# Altium PCB CM5_R6_Serigrafia_VIRTUS.PcbDoc (part 2 of 3)
Units mil, origin at the board's own origin, x right, y up, seen from the top; angles counter-clockwise.
Board outline 7086.61 x 4724.41 mil, 4 copper layers (Top Layer, GND L2, GND L3, Bottom Layer), stack 62.992 mil thick; 227 components, 122 nets, 905 pads, 209 vias.
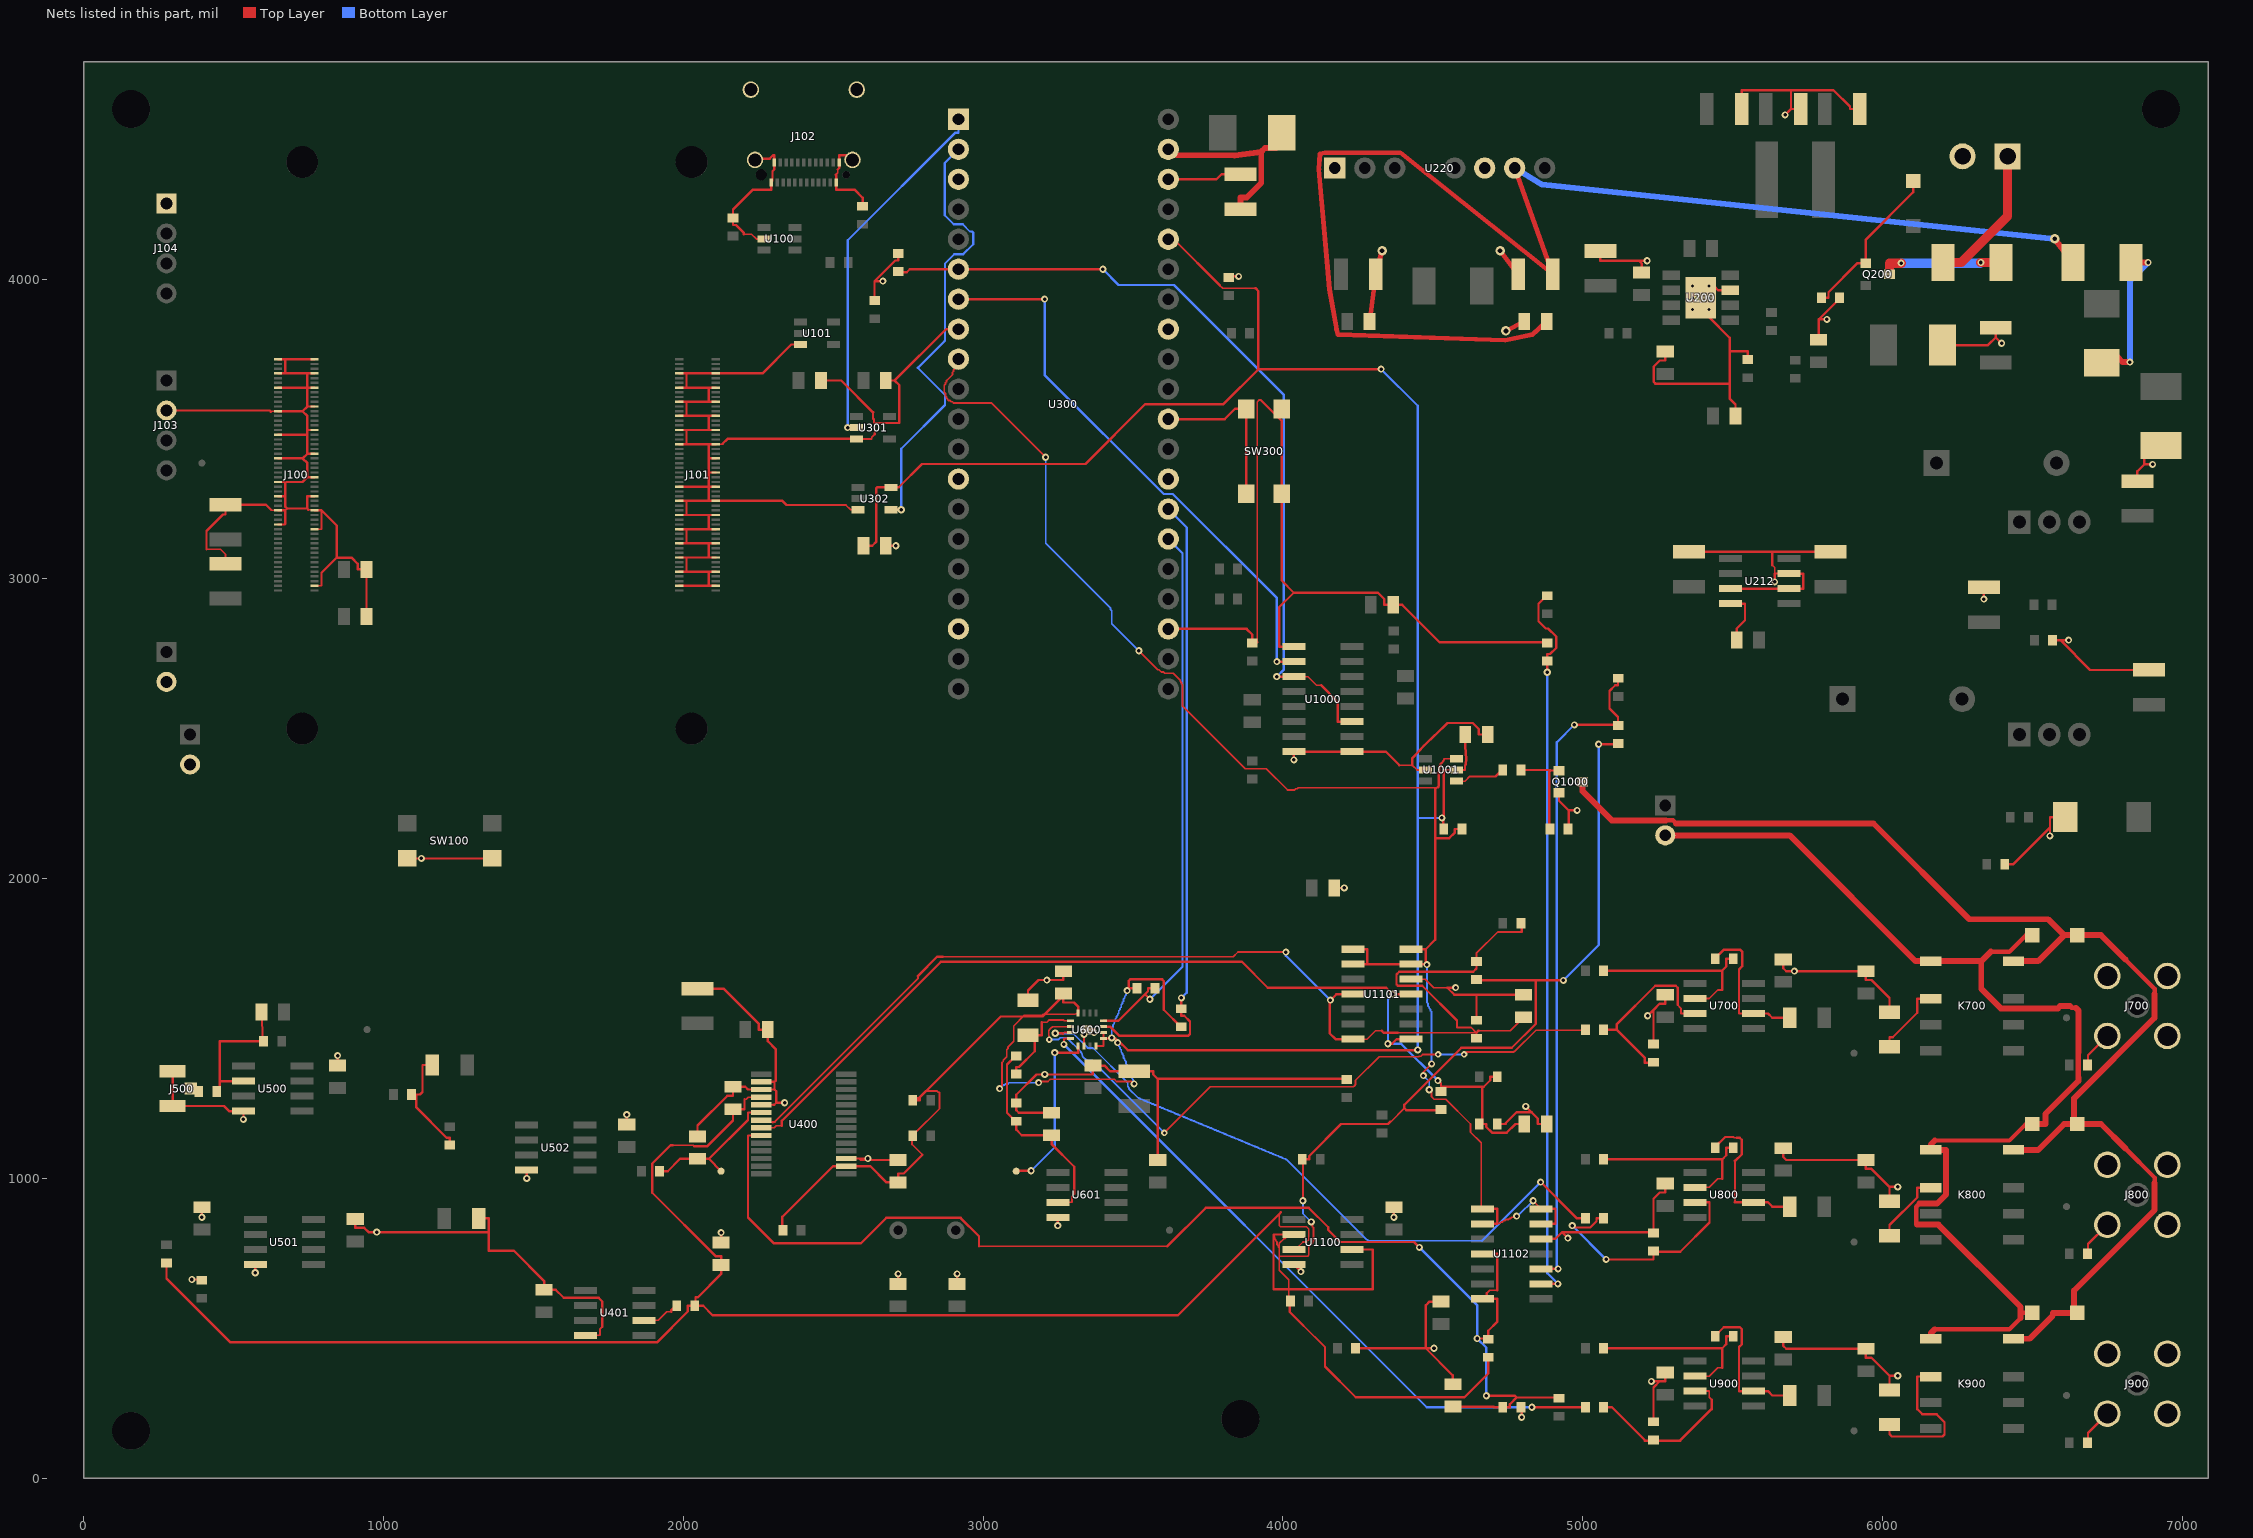
[diagram p4: the nets of this part, all layers, seen from the top]

## Via types
v1: diameter 23.62, hole 11.81, Top Layer to Bottom Layer, tented both sides, 181 vias
v2: diameter 21.65, hole 9.84, Top Layer to Bottom Layer, tented both sides, 24 vias
v3: diameter 31.5, hole 15.75, Top Layer to Bottom Layer, tented both sides, 4 vias

## Nets (pads, with @x,y where several pads share a name; then routed paths per layer and width w, separated by ;. In a path a pad name is that pad's centre, name@x,y a point inside that pad or via, vN(x,y) a via of type N, cw(c..) or ccw(c..) an arc to the next point about the centre after c; other vN are vias at no path point) (continued)
COIL_5V: D700.1 D800.1 D900.1 K700.1 K800.1 K900.1 SW1000.2 | length 4011.5
  Top Layer w14.76: 6115.55,845.4 6112.64,848.33 6112.64,905.03 6122.99,915.39 ; 6174.57,496.06 6423.66,496.06 6460.94,533.35 ; 6174.57,1126 6423.66,1126 6478.78,1181.1 D800.1@6509.84,1181.1 ; 6361.34,1755.92 6423.66,1755.92 6478.78,1811.02 D700.1@6509.84,1811.02 ; 6460.94,551.18 6478.78,551.18 D900.1@6509.84,551.18 ; 6625.55,1574.19 6630.87,1568.89 6645,1568.89
  Top Layer w17.72: 6653.54,1336.61 6653.54,1419.29
  Top Layer w19.68: SW1000.2@5275.59,2144.09 5690.47,2144.09 6110.16,1724.41 K700.1@6161.42,1724.41 6329.84,1724.41 ; 6115.55,845.39 6186.54,845.39 6460.94,570.98 6460.94,551.18 6460.94,533.35 ; 6122.99,915.39 6182.36,915.39 6212.68,945.72 6212.68,1094.49 K800.1@6161.42,1094.49 6161.42,1112.87 6174.57,1126 ; K900.1@6161.42,464.57 6161.42,482.95 6174.57,496.06 ; 6361.34,1755.92 6329.84,1724.41 ; D800.1@6509.84,1181.1 6543.39,1181.1 6543.39,1214.64 6653.54,1324.8 6653.54,1336.61 ; 6625.55,1574.19 6592.44,1574.19 6585.08,1566.85 6394.8,1566.85 6329.84,1631.83 6329.84,1724.41 ; 6645,1568.89 6653.54,1560.35 6653.54,1419.29
COIL_RETURN: D700.2 D800.2 D900.2 K700.8 K800.8 K900.8 Q1000.3 | length 4367.1
  Top Layer w14.76: 5277.09,2194.09 5301.34,2194.09 5312.01,2183.43 ; 6810.43,1099.9 6907.91,1002.44 6907.91,984.58 ; 6810.43,1729.82 6907.91,1632.36 6907.91,1614.5
  Top Layer w19.68: Q1000.3@5000,2322.83 5000,2291.26 5097.17,2194.09 5277.09,2194.09 ; 5312.01,2183.43 5970.04,2183.43 6289.21,1864.27 6552.99,1864.27 6606.22,1811.02 ; K900.8@6437.01,464.57 6491.22,464.57 6568.39,541.73 6568.39,551.18 6606.22,551.18 6639.76,551.18 6639.76,625.67 6907.91,893.8 6907.91,984.58 ; K800.8@6437.01,1094.49 6519.61,1094.49 6606.22,1181.1 D800.2@6639.76,1181.1 ; K700.8@6437.01,1724.41 6519.61,1724.41 6606.22,1811.02 ; 6810.43,1099.9 6729.25,1181.1 D800.2@6639.76,1181.1 ; 6810.43,1729.82 6729.25,1811.02 6639.76,1811.02 6606.22,1811.02 ; 6907.91,1614.5 6907.91,1535.1 6639.76,1266.95 D800.2@6639.76,1181.1
DAC_CS_N: R600.2 U300.26 U600.12 | length 1848.5
  Top Layer w7.87: U600.12@3401.57,1525.59 3451.48,1525.59 3539.76,1613.87 ; v1(3556.46,1597.17) 3539.76,1613.87 ; R600.2@3575.79,1633.86 3550.12,1633.86 3550.12,1624.23 3539.76,1613.87
  Bottom Layer w7.87: v1(3556.46,1597.17) 3665.12,1705.83 3665.12,3085.28 U300.26@3617.72,3132.68
DAC_I: R702.1 U600.2 | length 2187.6
  Top Layer w5.91: v2(3220.47,1462.6) 3220.47,1474.41 3218.5,1476.38 3218.5,1492.13 3220.47,1494.09 3220.47,1496.06 3228.35,1503.94 3230.31,1503.94 3232.28,1505.91 U600.2@3291.34,1505.91 ; v2(3604.33,1151.57) 3757.87,1305.12 4234.25,1305.12 4236.22,1307.09 4238.19,1307.09 4240.16,1309.06 4240.16,1311.02 4242.13,1312.99 4242.13,1326.77 4320.87,1405.51 4452.76,1405.51 4454.72,1407.48 4460.63,1407.48 4466.54,1413.39 v2(4517.72,1413.39) ; v2(4604.33,1413.39) 4612.2,1421.26 4769.69,1421.26 4771.65,1423.23 4773.62,1423.23 4844.49,1494.09 5003.94,1494.09 R702.1@5006.89,1496.06
  Bottom Layer w5.91: v2(3220.47,1462.6) 3250,1462.6 3251.97,1464.57 3253.94,1464.57 3257.87,1468.5 3279.53,1468.5 3326.77,1421.26 3326.77,1419.29 3328.74,1417.32 3328.74,1415.35 3330.71,1413.39 3330.71,1409.45 3332.68,1407.48 3332.68,1405.51 3340.55,1397.64 3342.52,1397.64 3344.49,1395.67 3346.46,1395.67 3348.43,1393.7 3362.2,1393.7 v2(3604.33,1151.57) ; v2(4517.72,1413.39) v2(4604.33,1413.39)
DAC_LDAC_N: R601.2 U300.27 U600.11 | length 2104.7
  Top Layer w7.87: U600.11@3401.57,1505.91 3423.3,1505.91 3453.27,1475.94 3684.6,1475.94 3690.04,1481.38 3690.04,1523.26 3671.04,1542.25 3661.42,1542.25 v1(3661.42,1601.54)
  Bottom Layer w7.87: U300.27@3617.72,3232.68 3679.15,3171.24 3679.15,1619.28 v1(3661.42,1601.54)
DAC_PHI: R902.1 U600.4 | length 2280.3
  Top Layer w7.87: v1(3269.61,1446.52) 3269.61,1466.54 U600.4@3291.34,1466.54 ; v1(4830.63,236.22) R902.1@5006.89,236.22
  Bottom Layer w7.87: v1(3269.61,1446.52) 4479.92,236.22 v1(4830.63,236.22)
DAC_Q: R802.1 U600.3 | length 2248.8
  Top Layer w5.91: 3265.94,1481.57 3270.59,1486.22 U600.3@3291.34,1486.22
  Top Layer w7.87: v1(3240.52,1483.86) 3263.64,1483.86 3265.94,1481.57 ; v1(4860,987.37) 4981.22,866.14 R802.1@5006.89,866.14
  Bottom Layer w5.91: 3302.25,1483.86 3303.15,1480.31 3348.43,1435.04 3364.17,1435.04 3366.14,1433.07 3368.11,1433.07 3482.28,1318.9 3482.28,1307.09 3484.25,1305.12 3484.25,1303.15 3486.22,1301.18 3486.22,1299.21 3517.72,1267.72 3519.68,1267.72 3521.65,1265.75 3523.62,1265.75 3525.59,1263.78 3529.53,1263.78 3531.5,1261.81 3533.46,1261.81 3535.43,1259.84 3537.4,1259.84 3539.37,1257.87 3543.31,1257.87 3545.28,1255.91 3547.24,1255.91 3549.21,1253.94 3553.15,1253.94 3555.12,1251.97 3557.09,1251.97 3559.06,1250 3561.02,1250 3562.99,1248.03 3566.93,1248.03 3568.9,1246.06 3570.87,1246.06 3572.83,1244.09 3576.77,1244.09 3578.74,1242.13 3580.71,1242.13 3582.68,1240.16 3584.65,1240.16 3586.61,1238.19 3590.55,1238.19 3592.52,1236.22 3594.49,1236.22 3596.46,1234.25 3600.39,1234.25 3602.36,1232.28 3604.33,1232.28 3606.3,1230.31 3608.27,1230.31 3610.24,1228.35 3614.17,1228.35 3616.14,1226.38 3618.11,1226.38 3620.08,1224.41 3624.02,1224.41 3625.98,1222.44 3627.95,1222.44 3629.92,1220.47 3633.86,1220.47 3635.83,1218.5 3637.8,1218.5 3639.76,1216.54 3641.73,1216.54 3643.7,1214.57 3647.64,1214.57 3649.61,1212.6 3651.57,1212.6 3653.54,1210.63 3657.48,1210.63 3659.45,1208.66 3661.42,1208.66 3663.39,1206.69 3665.35,1206.69 3667.32,1204.72 3671.26,1204.72 3673.23,1202.76 3675.2,1202.76 3677.17,1200.79 3681.1,1200.79 3683.07,1198.82 3685.04,1198.82 3687.01,1196.85 3688.98,1196.85 3690.94,1194.88 3694.88,1194.88 3696.85,1192.91 3698.82,1192.91 3700.79,1190.94 3704.72,1190.94 3706.69,1188.98 3708.66,1188.98 3710.63,1187.01 3712.6,1187.01 3714.57,1185.04 3718.5,1185.04 3720.47,1183.07 3722.44,1183.07 3724.41,1181.1 3728.35,1181.1 3730.31,1179.13 3732.28,1179.13 3734.25,1177.17 3736.22,1177.17 3738.19,1175.2 3742.13,1175.2 3744.09,1173.23 3746.06,1173.23 3748.03,1171.26 3751.97,1171.26 3753.94,1169.29 3755.91,1169.29 3757.87,1167.32 3761.81,1167.32 3763.78,1165.35 3765.75,1165.35 3767.72,1163.39 3769.68,1163.39 3771.65,1161.42 3775.59,1161.42 3777.56,1159.45 3779.53,1159.45 3781.5,1157.48 3785.43,1157.48 3787.4,1155.51 3789.37,1155.51 3791.34,1153.54 3793.31,1153.54 3795.28,1151.57 3799.21,1151.57 3801.18,1149.61 3803.15,1149.61 3805.12,1147.64 3809.06,1147.64 3811.02,1145.67 3812.99,1145.67 3814.96,1143.7 3816.93,1143.7 3818.9,1141.73 3822.83,1141.73 3824.8,1139.76 3826.77,1139.76 3828.74,1137.8 3832.68,1137.8 3834.65,1135.83 3836.61,1135.83 3838.58,1133.86 3840.55,1133.86 3842.52,1131.89 3846.46,1131.89 3848.43,1129.92 3850.39,1129.92 3852.36,1127.95 3856.3,1127.95 3858.27,1125.98 3860.24,1125.98 3862.2,1124.02 3866.14,1124.02 3868.11,1122.05 3870.08,1122.05 3872.05,1120.08 3874.02,1120.08 3875.98,1118.11 3879.92,1118.11 3881.89,1116.14 3883.86,1116.14 3885.83,1114.17 3889.76,1114.17 3891.73,1112.2 3893.7,1112.2 3895.67,1110.24 3897.64,1110.24 3899.61,1108.27 3903.54,1108.27 3905.51,1106.3 3907.48,1106.3 3909.45,1104.33 3913.39,1104.33 3915.35,1102.36 3917.32,1102.36 3919.29,1100.39 3921.26,1100.39 3923.23,1098.43 3927.17,1098.43 3929.13,1096.46 3931.1,1096.46 3933.07,1094.49 3937.01,1094.49 3938.98,1092.52 3940.94,1092.52 3942.91,1090.55 3944.88,1090.55 3946.85,1088.58 3950.79,1088.58 3952.76,1086.61 3954.72,1086.61 3956.69,1084.65 3960.63,1084.65 3962.6,1082.68 3964.57,1082.68 3966.54,1080.71 3968.5,1080.71 3970.47,1078.74 3974.41,1078.74 3976.38,1076.77 3978.35,1076.77 3980.31,1074.8 3984.25,1074.8 3986.22,1072.83 3988.19,1072.83 3990.16,1070.87 3994.09,1070.87 3996.06,1068.9 3998.03,1068.9 4000,1066.93 4001.97,1066.93 4003.94,1064.96 4007.87,1064.96 4009.84,1062.99 4011.81,1062.99 4279.53,795.28 4281.5,795.28 4283.46,793.31 4285.43,793.31 4287.4,791.34 4659.45,791.34 4664.21,791.61
  Bottom Layer w7.87: v1(3240.52,1483.86) 3302.25,1483.86 ; 4664.21,791.61 v1(4860,987.37)
DAC_SPARE: TP600.1 U600.5 | length 577.1
  Top Layer w7.87: TP600.1@3110.24,1023.62 3111.78,1025.16 v1(3160.31,1025.16) ; v1(3238.83,1419.22) 3316.93,1419.22 U600.5@3316.93,1440.94
  Bottom Layer w7.87: v1(3160.31,1025.16) 3238.83,1103.68 v1(3238.83,1419.22)
DRV_I: R701.1 R704.1 U700.6 | length 492.2
  Top Layer w7.87: R701.1@5439.96,1732.28 5469.65,1761.95 5526.14,1761.95 5531.93,1756.16 5531.93,1707.11 5521.57,1696.76 5521.57,1549.8 U700.6@5569.88,1549.8 5618.19,1549.8 5632.56,1535.43 R704.1@5690.45,1535.43
DRV_PHI: R901.1 R904.1 U900.6 | length 549.2
  Top Layer w7.87: R901.1@5439.96,472.44 5470.47,502.95 5524.57,502.95 5530.59,496.93 5530.59,445.94 5521.57,436.93 5521.57,289.96 U900.6@5569.88,289.96 5618.19,289.96 5632.56,275.59 ; 5632.56,275.59 R904.1@5690.45,275.59 5632.56,275.59
DRV_Q: R801.1 R804.1 U800.6 | length 575.1
  Top Layer w5.91: 5501.85,1137.82 5504.8,1134.88 5514.53,1134.88 ; 5507.8,919.88 5507.8,1058.94
  Top Layer w7.87: R801.1@5439.96,1102.36 5475.43,1137.82 5501.85,1137.82 ; 5507.8,919.88 U800.6@5569.88,919.88 5618.19,919.88 5632.56,905.51 ; 5507.8,1058.94 5509.96,1058.94 5530.59,1079.56 5530.59,1128.58 5524.29,1134.88 5514.53,1134.88 ; 5632.56,905.51 R804.1@5690.45,905.51 5632.56,905.51
EXT_P15: F200.1 J200.1 | length 478.6
  Top Layer w31.5: F200.1@6202.56,4055.12 6262.87,4055.12 6417.32,4209.57 J200.1@6417.32,4409.45
FAULT_N: R1004.2 U300.9 U1001.6 U1101.1 U1101.2 U1101.13 U1101.14 U1102.1 U1102.2 U1102.13 U1102.14 | length 5398.4
  Top Layer w5.91: U300.9@2917.72,3732.68 2913.39,3724.41 2913.39,3720.47 2909.45,3716.54 2909.45,3708.66 2905.51,3704.72 2905.51,3700.79 2901.57,3696.85 2901.57,3692.91 2897.64,3688.98 2897.64,3681.1 2877.95,3661.42 2877.95,3657.48 2874.02,3653.54 2874.02,3649.61 2870.08,3645.67 2870.08,3622.05 2874.02,3618.11 2874.02,3610.24 2877.95,3606.3 2877.95,3602.36 2885.83,3594.49 2889.76,3594.49 2893.7,3590.55 2897.64,3590.55 2901.57,3586.61 3027.56,3586.61 v1(3208.66,3405.51) ; v1(3519.68,2759.84) 3582.68,2696.85 3586.61,2696.85 3594.49,2688.98 3602.36,2688.98 3606.3,2685.04 3633.86,2685.04 3657.48,2661.42 3657.48,2657.48 3661.42,2653.54 3661.42,2649.61 3665.35,2645.67 3665.35,2574.8 3874.02,2366.14 3944.88,2366.14 4015.75,2295.28 4039.37,2295.28 4043.31,2299.21 4047.24,2299.21 4051.18,2303.15 4519.69,2303.15 4519.69,2374.02 4531.5,2385.83 4537.32,2395.58 ; U1101.13@4428.15,1714.17 4437.01,1712.6 v1(4480.31,1712.6) ; v1(4468.5,1342.52) 4468.5,1354.33 v1(4496.06,1381.89) ; v1(4488.19,1295.28) 4496.06,1287.4 4496.06,1271.65 4503.94,1263.78 4543.31,1263.78 4625.98,1181.1 4625.98,1153.54 4661.42,1118.11 4661.42,905.51 U1102.1@4666.34,898.03 ; 4519.69,2355.3 4522.64,2358.26 4522.64,2369.1 ; 4525.63,2383.87 4537.32,2395.58 ; U1001.6@4572.36,2399.61 4537.32,2399.61 4537.32,2395.58 ; 4714.65,848.03 4724.41,850.39 4728.35,854.33 4732.28,854.33 4736.22,858.27 4740.16,858.27 4744.09,862.2 4751.97,862.2 4755.91,866.14 4759.84,866.14 4763.78,870.08 4771.65,870.08 4775.59,874.02 v1(4779.53,874.02) ; v1(4834.65,925.2) 4854.33,905.51 U1102.14@4861.22,898.03
  Top Layer w7.87: U1101.2@4233.27,1714.17 4281.57,1714.17 ; U1101.1@4233.27,1764.17 4281.57,1764.17 4281.57,1714.17 ; U1101.14@4428.15,1764.17 4476.46,1764.17 ; 4519.69,2355.3 4519.69,2309.73 4507.87,2297.93 4507.87,2134.49 ; 4522.64,2369.1 4525.63,2372.06 4525.63,2383.87 ; R1004.2@4599.41,2165.35 4573.74,2165.35 4573.74,2153.78 4554.45,2134.49 4507.87,2134.49 ; U1102.2@4666.34,848.03 4714.65,848.03 4714.65,898.03 U1102.1@4666.34,898.03 ; U1102.13@4861.22,848.03 4909.53,848.03 4909.53,898.03 U1102.14@4861.22,898.03 ; 4281.57,1714.17 U1101.13@4428.15,1714.17 4476.46,1714.17 4476.46,1764.17 ; 4476.46,1764.17 4507.87,1795.61 4507.87,2134.49
  Bottom Layer w5.91: v1(3208.66,3405.51) 3208.66,3118.11 3425.2,2901.57 3425.2,2897.64 3429.13,2893.7 3429.13,2850.39 v1(3519.68,2759.84) ; v1(4468.5,1342.52) 4488.19,1322.83 v1(4488.19,1295.28) ; v1(4480.31,1712.6) 4480.31,1586.61 4484.25,1582.68 4484.25,1574.8 4488.19,1570.87 4488.19,1566.93 4492.13,1562.99 4492.13,1559.06 4496.06,1555.12 v1(4496.06,1381.89) ; v1(4779.53,874.02) 4783.46,877.95 4787.4,877.95 v1(4834.65,925.2)
GATE_REV: D200.2 Q200.1 R200.1 | length 538.8
  Top Layer w7.87: R200.1@5794.29,3937.01 5819.96,3937.01 5819.96,3955.86 5917.24,4053.15 Q200.1@5944.88,4053.15 5944.88,4131.81 6102.36,4289.3 D200.2@6102.36,4316.93
GND: C100.2 C110.2 C111.2 C112.2 C113.2 C200.2 C201.2 C202.2 C203.2 C205.2 C206.2 C207.2 C208.2 C209.2 C210.2 C211.2 C212.2 C213.1 C214.2 C215.2 C220.2 C221.2 C222.1 C223.1 C300.2 C301.2 C302.2 C400.2 C401.2 C402.2 C403.2 C404.2 C405.2 C406.2 C407.2 C501.2 C502.2 C503.2 C505.2 C506.2 C507.2 C600.2 C601.2 C602.2 C603.2 C604.2 C605.2 C700.2 C701.2 C702.2 C800.2 C801.2 C802.2 C900.2 C901.2 C902.2 C1002.2 C1003.2 C1004.2 C1005.2 C1100.2 C1110.2 C1111.2 C1112.2 D201.2 D203.1 J100.1 J100.2 J100.7 J100.8 J100.13 J100.14 J100.22 J100.23 J100.32 J100.33 J100.42 J100.43 J100.52 J100.53 J100.59 J100.60 J100.65 J100.66 J100.71 J100.74 J100.98 J101.7 J101.8 J101.13 J101.14 J101.19 J101.20 J101.25 J101.26 J101.31 J101.32 J101.37 J101.38 J101.44 J101.50 J101.55 J101.56 J101.61 J101.62 J101.67 J101.68 J101.73 J101.74 J101.79 J101.80 J101.85 J101.86 J101.91 J101.92 J101.97 J101.98 J102.A1 J102.A12 J102.B1 J102.B12 J102.SH J103.2 J104.1 J200.2 J500.2 J700.2 J800.2 J900.2 JP100.2 JP101.2 Q1000.2 R100.2 R101.2 R103.2 R200.2 R203.2 R211.2 R213.2 R302.2 R502.2 R603.2 R703.2 R705.2 R706.2 R803.2 R805.2 R806.2 R903.2 R905.2 R906.2 R1003.2 R1005.2 R1007.2 R1010.2 R1102.2 R1104.2 R1112.2 R1116.2 R1120.2 SW100.2 SW300.2 U100.2 U101.3 U200.7 U200.9 U212.3 U212.6 U212.7 U220.1 U220.6 U300.3 U300.8 U300.13 U300.18 U300.23 U300.28 U300.33 U300.38 U301.3 U302.3 U400.2 U400.3 U400.5 U400.17 U401.4 U500.4 U501.4 U502.4 U600.6 U600.17 U601.4 U1000.1 U1000.8 U1000.9 U1001.2 U1100.4 U1101.12 U1102.12 | length 27829.3
  Top Layer w5.91: 409.19,3098.41 455.8,3098.41 472.44,3081.77 C111.2@472.44,3050.2 ; 623.42,3557.16 625.32,3559.06 J100.23@648.03,3559.05 ; 624.33,3230.3 625.32,3229.31 625.32,3228.35 J100.65@648.03,3228.35 ; J100.71@648.03,3181.1 670.74,3181.1 670.74,3182.06 671.74,3183.06 ; 749.13,3230.3 767.34,3230.3 J100.66@769.29,3228.35 ; J100.98@769.29,2976.38 792,2976.38 792,2977.34 793,2978.33 ; J100.74@769.29,3165.35 792,3165.35 792,3165.83 ; 792.93,3165.83 792.93,3228.35 ; U401.4@1674.21,476.18 1721.53,476.18 1721.53,496.69 1729.36,504.53 ; J101.38@2107.87,3448.82 2130.59,3448.82 2130.59,3449.78 2131.58,3450.77 ; 2200.81,4149.59 2227.3,4149.59 2243.04,4133.86 U100.2@2278.05,4133.86 ; U400.5@2259.84,1245.08 2300.24,1245.08 ; J102.A12@2293.31,4322.05 2297.23,4325.97 2297.23,4342.8 ; 2303.22,1245.08 2310.1,1251.95 ; 2344.04,3246.05 2542.26,3246.05 2558,3230.31 U302.3@2593.01,3230.31 ; 2507.81,4347.78 2514.75,4354.72 2514.75,4365.34 ; U301.3@2593.01,3466.54 2628.03,3466.54 2628.03,3471.52 2638.78,3482.27 ; 2632.89,3534.44 2632.89,3555.03 ; 2635.85,3519.67 2638.78,3519.67 ; 2638.78,3486.22 2638.78,3519.67 ; 2720.26,3519.67 2638.78,3519.67 ; R1005.2@3914.37,2788.39 3914.37,3589.81 3921.14,3596.58 ; 4388.66,2377.94 4432.05,2377.94 4447.76,2362.2 U1001.2@4482.76,2362.2 ; U1101.12@4428.15,1664.17 4475.47,1664.17 4503.78,1635.84 4548.35,1635.84 ; 5632.83,3045.46 5640.67,3037.63 5640.67,3017.13 U212.7@5687.99,3017.13
  Top Layer w7.87: J103.2@275.59,3561.42 619.16,3561.42 623.42,3557.16 ; J500.2@296.26,1357.28 J500.2@296.26,1241.14 467.25,1241.14 484.18,1224.21 U500.4@532.48,1224.21 v1(532.48,1196.65) ; v1(360.24,662.4) R502.2@393.7,662.4 ; v1(393.7,870.08) C502.2@393.7,903.54 ; 409.19,3098.41 409.19,3159.38 464.3,3214.49 472.44,3214.49 C110.2@472.44,3247.05 607.58,3247.05 624.33,3230.3 ; v1(571.85,684.84) U501.4@571.85,712.4 ; J100.65@648.03,3228.35 671.73,3228.35 ; J100.59@648.03,3275.59 671.73,3275.59 ; J100.53@648.03,3322.83 671.73,3322.83 ; J100.43@648.03,3401.57 729.85,3401.57 ; J100.33@648.03,3480.31 745.59,3480.31 ; J100.23@648.03,3559.05 729.85,3559.06 ; J100.13@648.03,3637.8 745.59,3637.8 ; J100.7@648.03,3685.04 659.88,3685.04 671.73,3685.04 ; J100.1@648.03,3732.28 671.73,3732.28 ; 671.73,3183.06 671.73,3228.35 ; 749.13,3230.3 744.91,3234.52 ; J100.66@769.29,3228.35 792.93,3228.35 843.61,3177.67 843.61,3070.68 ; J100.60@769.29,3275.59 745.59,3275.59 745.59,3235.2 744.91,3234.52 ; J100.52@769.29,3338.58 745.59,3338.58 ; J100.42@769.29,3417.32 745.59,3417.32 ; J100.32@769.29,3496.06 745.65,3496.06 ; J100.22@769.29,3574.8 745.59,3574.8 ; J100.14@769.29,3637.8 745.59,3637.8 ; J100.8@769.29,3685.04 745.59,3685.04 ; J100.2@769.29,3732.28 745.59,3732.28 671.73,3732.28 ; 792,3165.83 792.93,3165.83 ; 793,2978.33 793,3020.07 843.61,3070.68 ; C501.2@846.46,1375.98 v1(846.46,1409.45) ; C503.2@905.51,864.17 905.51,834.57 935.11,834.57 949.39,820.29 ; C113.2@942.91,2874.02 C112.2@942.91,3031.5 913.31,3031.5 913.31,3050 892.63,3070.68 843.61,3070.68 ; v1(976.95,820.29) 949.39,820.29 ; v1(1125.98,2066.93) SW100.2@1078.74,2066.93 SW100.2@1362.2,2066.93 ; C505.2@1317.91,866.14 1350.47,866.14 1350.47,820.29 ; v1(1477.36,999.8) U502.4@1477.36,1027.36 ; 1729.36,504.53 1729.36,589.09 1717.28,601.18 1600.67,601.18 1573.89,627.95 C407.2@1535.43,627.95 1535.43,657.56 1434.58,758.43 1350.47,758.43 1350.47,820.29 ; C506.2@1811.02,1179.13 v1(1811.02,1212.6) ; J101.97@1986.61,2976.38 2084.18,2976.38 ; J101.91@1986.61,3023.62 2010.31,3023.62 ; J101.85@1986.61,3070.87 2010.31,3070.87 ; J101.79@1986.61,3118.11 2010.31,3118.11 ; J101.73@1986.61,3165.35 2010.31,3165.35 ; J101.67@1986.61,3212.6 2010.31,3212.6 ; J101.61@1986.61,3259.84 2010.31,3259.84 ; J101.55@1986.61,3307.09 2084.18,3307.09 ; J101.37@1986.61,3448.82 2010.31,3448.82 ; J101.31@1986.61,3496.06 2010.31,3496.06 ; J101.25@1986.61,3543.31 2010.31,3543.31 ; J101.19@1986.61,3590.55 2010.31,3590.55 ; J101.13@1986.61,3637.8 2010.31,3637.8 ; J101.7@1986.61,3685.04 2010.31,3685.04 ; C507.2@2047.24,1139.76 2047.24,1175.91 2146.85,1275.52 2165.35,1275.52 C401.2@2165.35,1305.12 2206.62,1305.12 2215.48,1296.26 U400.3@2259.84,1296.26 2304.21,1296.26 ; C403.2@2047.24,1632.87 2133.58,1632.87 2251.89,1514.56 2251.89,1496.06 C402.2@2281.5,1496.06 2281.5,1457.6 2307.6,1431.5 2307.6,1325.3 2304.15,1321.85 ; J101.98@2107.87,2976.38 2084.18,2976.38 ; J101.92@2107.87,3023.62 2096.03,3023.62 2084.18,3023.62 ; J101.86@2107.87,3070.87 2084.18,3070.87 ; J101.80@2107.87,3118.11 2096.03,3118.11 2084.18,3118.11 ; J101.74@2107.87,3165.35 2084.18,3165.35 ; J101.68@2107.87,3212.6 2096.03,3212.6 2084.18,3212.6 ; J101.56@2107.87,3307.09 2096.03,3307.09 2084.18,3307.09 ; J101.50@2107.87,3354.33 2084.18,3354.33 ; J101.44@2107.87,3401.57 2084.24,3401.57 ; J101.38@2107.87,3448.82 2084.18,3448.82 ; J101.32@2107.87,3496.06 2096.03,3496.06 2084.18,3496.06 ; J101.26@2107.87,3543.31 2084.18,3543.31 ; J101.20@2107.87,3590.55 2096.03,3590.55 2084.18,3590.55 ; J101.14@2107.87,3637.8 2084.18,3637.8 ; C400.2@2125.98,785.43 v1(2125.98,818.9) ; 2131.58,3450.77 2147.34,3466.54 U301.3@2593.01,3466.54 ; 2200.81,4149.59 2200.81,4154.76 2175.53,4180.04 2165.35,4180.04 2165.35,4205.71 2165.35,4231.37 2232.33,4298.35 2293.31,4298.35 J102.A12@2293.31,4322.05 ; J102.SH@2238.98,4397.24 2242.76,4401.02 2287.78,4401.02 2299.37,4412.61 2303.09,4412.61 2303.15,4412.67 J102.B1@2303.15,4388.98 2303.15,4365.28 2297.23,4359.36 2297.23,4342.8 ; U400.2@2259.84,1321.85 2300.73,1321.85 2304.15,1321.85 ; 2300.24,1245.08 2303.22,1245.08 ; v1(2337.66,1251.95) 2310.1,1251.95 2310.1,1290.37 2304.21,1296.26 ; 2344.04,3246.05 2330.25,3259.84 J101.62@2107.87,3259.84 2084.18,3259.84 ; U101.3@2396.16,3781.5 2360.16,3781.5 2263.7,3685.04 J101.8@2107.87,3685.04 2010.31,3685.04 ; C100.2@2458.66,3661.42 2488.26,3661.42 2526.5,3661.42 2632.89,3555.03 ; 2507.81,4347.78 2509.84,4345.74 J102.A1@2509.84,4322.05 2509.84,4298.35 2570.82,4298.35 2598.43,4270.74 R101.2@2598.43,4245.08 ; 2514.75,4365.34 2519.68,4370.28 J102.B12@2519.68,4388.98 2519.68,4412.67 2548.74,4412.67 J102.SH@2564.17,4397.24 ; U400.17@2543.31,1065.94 2587.67,1065.94 ; v1(2615.23,1065.94) 2587.67,1065.94 ; 2632.89,3534.44 2635.85,3531.48 2635.85,3519.67 ; R103.2@2637.8,3930.12 2637.8,3992.82 ; 2638.78,3482.27 2638.78,3486.22 ; v1(2665.35,3992.82) 2637.8,3992.82 ; C302.2@2675.2,3110.24 v1(2708.66,3110.24) ; C301.2@2675.2,3661.42 2704.8,3661.42 ; C405.2@2716.54,647.64 v1(2716.54,681.1) ; C404.2@2716.54,1061.02 2592.59,1061.02 2587.67,1065.94 ; R302.2@2716.54,4087.6 2716.54,4061.93 2706.91,4061.93 2637.8,3992.82 ; 2720.26,3519.67 2720.26,3645.95 2704.8,3661.42 ; C406.2@2913.39,647.64 v1(2913.39,681.1) ; U300.8@2917.72,3832.68 2876.06,3832.68 2704.8,3661.42 ; C603.2@3149.61,1593.5 3149.61,1626.06 3184.89,1661.34 ; v1(3205.56,1346.38) 3178,1346.38 ; v1(3212.45,1661.34) 3184.89,1661.34 ; C604.2@3228.35,1218.5 3119.02,1218.5 3110.24,1227.29 3110.24,1252.95 3110.24,1278.62 3178,1346.38 ; v1(3249.02,842.32) U601.4@3249.02,869.88 ; C602.2@3267.72,1690.94 3267.72,1661.34 3184.89,1661.34 ; U600.6@3336.61,1440.94 v1(3336.61,1480.31) ; U600.17@3346.46,1496.06 3372.12,1496.06 3372.12,1488.11 v1@3374.02,1486.22 ; C605.2@3582.68,1061.02 3582.68,1090.63 3582.68,1331.69 ; U300.23@3617.72,2832.68 3879.01,2832.68 3897.64,2814.05 3897.64,2788.39 R1005.2@3914.37,2788.39 ; U300.38@3617.72,4332.68 3778.47,4332.68 3795.2,4349.41 C300.2@3858.27,4349.41 ; R1010.2@3818.9,4008.86 v1(3852.36,4008.86) ; 3921.14,3596.58 3926.2,3596.58 SW300.2@3975.94,3546.82 ; SW300.2@3996.06,3566.93 SW300.2@3975.94,3546.82 ; U1100.4@4036.42,712.4 v1(4060.08,688.74) ; v1(4036.42,2395.87) U1000.8@4036.42,2423.43 U1000.9@4231.3,2423.43 4343.15,2423.43 4388.66,2377.94 ; U1000.1@4036.42,2773.43 3988.11,2773.43 3988.11,2905.33 4036.42,2953.64 ; C1003.2@4171.26,1968.5 v1(4204.72,1968.5) ; R1102.2@4212.6,1331.69 4183.98,1331.69 3582.68,1331.69 ; R1104.2@4245.08,433.07 4476.46,433.07 ; v1(4370.08,870.08) C1100.2@4370.08,903.54 ; 4432.05,2377.94 4432.05,2401.65 4470.43,2442.99 4549.13,2518.78 4633.5,2518.78 4653.46,2498.81 4653.46,2480.31 C1005.2@4683.07,2480.31 ; v1(4504.02,433.07) 4476.46,433.07 ; C1004.2@4527.56,588.58 4489.09,588.58 4476.46,575.94 4476.46,433.07 ; C1112.2@4566.93,312.99 4566.93,342.6 4476.46,433.07 ; v1(4575.91,1635.84) 4548.35,1635.84 4571.97,1612.2 4645.67,1612.2 ; R1112.2@4645.67,1528.54 4645.67,1612.2 ; R1116.2@4717.52,1181.1 4743.19,1181.1 4743.19,1184.31 4779.09,1220.23 4829.69,1220.23 ; v1(4796.26,202.76) R1120.2@4796.26,236.22 ; C1110.2@4803.15,1612.2 4645.67,1612.2 ; v1(4810.2,1239.72) 4829.69,1220.23 ; U1102.12@4861.22,798.03 4909.53,798.03 4931.38,819.88 ; C1111.2@4879.92,1181.1 4850.31,1181.1 4850.31,1199.6 4829.69,1220.23 ; R1007.2@4881.89,2788.39 4522.72,2788.39 4397.72,2913.39 C1002.2@4368.11,2913.39 4338.5,2913.39 4338.5,2931.89 4316.77,2953.64 4036.42,2953.64 ; Q1000.2@4921.26,2285.43 4921.26,2259.77 4953.74,2227.29 ; v1(4950.87,800.39) 4931.38,819.88 ; R1003.2@4953.74,2165.35 4953.74,2227.29 ; v1(4981.3,2227.29) 4953.74,2227.29 ; C201.2@5059.06,4093.5 5059.06,4060.95 5187.17,4060.95 ; C202.2@5196.85,4021.65 5196.85,4051.26 5187.17,4060.95 ; v1(5214.72,4060.95) 5187.17,4060.95 ; v1(5216.73,1542.24) 5236.22,1561.73 ; v1(5229.53,322.76) 5257.09,322.76 ; R903.2@5236.22,189.96 5236.22,301.89 5257.09,322.76 ; R703.2@5236.22,1449.8 5236.22,1561.73 ; C902.2@5275.59,352.36 5275.59,322.76 5257.09,322.76 ; C802.2@5275.59,982.28 5275.59,952.68 5257.09,952.68 5236.22,931.81 5236.22,819.88 4931.38,819.88 ; C702.2@5275.59,1612.2 5275.59,1582.6 5257.09,1582.6 5236.22,1561.73 ; C203.2@5275.59,3757.87 5275.59,3728.27 5257.09,3728.27 5237.13,3708.31 5237.13,3656.71 5242.72,3651.14 5490.16,3651.14 ; C215.2@5354.33,3089.57 5632.83,3089.57 ; v2(5366.14,3937.01) U200.9@5393.7,3937.01 ; v2(5421.26,3897.64) 5421.26,3872.81 5490.16,3803.91 5490.16,3758.93 ; v2(5421.26,3976.38) 5438.11,3976.38 5452.48,3962.01 U200.7@5492.03,3962.01 ; U212.3@5493.11,2967.13 U212.6@5687.99,2967.13 5736.3,2967.13 5736.3,3017.13 U212.7@5687.99,3017.13 ; C209.2@5509.84,3543.31 5509.84,3581.77 5490.16,3601.44 5490.16,3651.14 ; C207.2@5530.51,4566.93 5530.51,4630 5694.8,4630 ; R203.2@5551.18,3733.27 5551.18,3758.93 5490.16,3758.93 ; 5632.83,3045.46 5632.83,3089.57 ; v1(5640.67,2989.57) 5640.67,3017.13 ; C901.2@5669.29,470.47 5669.29,440.87 5679.06,431.1 C900.2@5944.88,431.1 5944.88,401.5 5963.39,401.5 6023.62,341.26 ; C801.2@5669.29,1100.39 5669.29,1070.79 5679.06,1061.02 C800.2@5944.88,1061.02 5944.88,1031.42 5963.39,1031.42 6023.62,971.18 ; C701.2@5669.29,1730.31 5669.29,1700.71 5679.06,1690.94 ; v1(5675.31,4547.44) 5694.8,4566.93 ; v1(5706.61,1690.94) 5679.06,1690.94 ; C206.2@5727.36,4566.93 5694.8,4566.93 ; C208.2@5787.4,3797.24 5787.4,3865.16 ; v1(5814.96,3865.16) 5787.4,3865.16 ; C214.2@5826.77,3089.57 5632.83,3089.57 ; R200.2@5859.25,3937.01 5787.4,3865.16 ; C205.2@5924.21,4566.93 5891.65,4566.93 5891.65,4575.07 5836.73,4630 5694.8,4630 ; R905.2@6023.62,293.8 6023.62,341.26 ; R805.2@6023.62,923.72 6023.62,971.18 ; R705.2@6023.62,1553.64 6023.62,1601.1 5963.39,1661.34 5944.88,1661.34 C700.2@5944.88,1690.94 5679.06,1690.94 ; v1(6051.18,341.26) 6023.62,341.26 ; v1(6051.18,971.18) 6023.62,971.18 ; D201.2@6187.01,3779.53 6352.44,3779.53 6377.95,3805.04 ; v1(6338.58,2932.09) C211.2@6338.58,2971.46 ; C200.2@6377.95,3837.6 6377.95,3805.04 ; v1(6397.44,3785.56) 6377.95,3805.04 ; R213.2@6410.43,2047.24 6436.1,2047.24 6558.98,2170.13 ; v1(6558.98,2142.57) 6558.98,2170.13 ; R211.2@6567.91,2795.28 6593.58,2795.28 ; C213.1@6609.76,2204.72 6558.98,2204.72 6558.98,2170.13 ; v1(6621.14,2795.28) 6593.58,2795.28 ; R906.2@6686.02,118.11 6686.02,150.59 J900.2@6750.39,214.96 ; R806.2@6686.02,748.03 6686.02,780.51 J800.2@6750.39,844.88 ; R706.2@6686.02,1377.95 6686.02,1410.43 J700.2@6750.39,1474.8 ; C210.2@6850.39,3325.79 6850.39,3358.34 6873.94,3381.89 ; C212.2@6889.76,2695.87 6692.99,2695.87 6593.58,2795.28 ; v1(6901.5,3381.89) 6873.94,3381.89 ; D203.1@6929.13,3458.66 6873.94,3458.66 6873.94,3381.89 ; 671.73,3228.35 677.9,3234.52 ; 671.73,3275.59 671.73,3322.83 ; 671.73,3275.59 671.73,3240.68 677.9,3234.52 ; 671.73,3322.83 729.85,3322.83 745.59,3338.58 ; 671.73,3685.04 745.59,3685.04 ; 671.73,3685.04 671.73,3732.28 ; 677.9,3234.52 744.91,3234.52 ; 729.85,3401.57 745.59,3417.32 ; 729.85,3401.57 745.59,3385.83 745.59,3338.58 ; 729.85,3559.06 745.59,3574.8 ; 729.85,3559.06 745.59,3543.31 745.59,3496.06 745.65,3496.06 ; 745.59,3417.32 745.59,3480.31 ; 745.59,3480.31 745.59,3496 745.65,3496.06 ; 745.59,3574.8 745.59,3637.8 ; 745.59,3637.8 745.59,3685.04 ; 949.39,820.29 1350.47,820.29 ; 2010.31,3023.62 2084.18,3023.62 ; 2010.31,3023.62 2010.31,3070.87 ; 2010.31,3070.87 2084.18,3070.87 ; 2010.31,3118.11 2010.31,3165.35 ; 2010.31,3118.11 2084.18,3118.11 ; 2010.31,3165.35 2084.18,3165.35 ; 2010.31,3212.6 2084.18,3212.6 ; 2010.31,3212.6 2010.31,3259.84 ; 2010.31,3259.84 2084.18,3259.84 ; 2010.31,3448.82 2084.18,3448.82 ; 2010.31,3448.82 2010.31,3496.06 ; 2010.31,3496.06 2084.18,3496.06 ; 2010.31,3543.31 2010.31,3590.55 ; 2010.31,3543.31 2084.18,3543.31 ; 2010.31,3590.55 2084.18,3590.55 ; 2010.31,3637.8 2010.31,3685.04 ; 2010.31,3637.8 2084.18,3637.8 ; 2084.18,2976.38 2084.18,3023.62 ; 2084.18,3070.87 2084.18,3118.11 ; 2084.18,3165.35 2084.18,3212.6 ; 2084.18,3259.84 2084.18,3307.09 ; 2084.18,3307.09 2084.18,3354.33 ; 2084.18,3354.33 2084.18,3401.52 2084.24,3401.57 ; 2084.18,3448.82 2084.18,3401.57 2084.24,3401.57 ; 2084.18,3496.06 2084.18,3543.31 ; 2084.18,3590.55 2084.18,3637.8 ; 2304.15,1321.85 2304.21,1321.85 2304.21,1296.26 ; 3178,1346.38 3366.14,1346.38 C600.2@3366.14,1375.98 3404.6,1375.98 3423.3,1357.28 C601.2@3503.94,1357.28 3567,1357.28 3567,1347.37 3582.68,1331.69 ; SW300.2@3975.94,3546.82 3996.06,3526.71 SW300.2@3996.06,3283.46 3996.06,2993.99 4036.42,2953.64 ; 5490.16,3651.14 5490.16,3758.93 ; 5694.8,4566.93 5694.8,4630
  Top Layer w15.75: C221.2@4289.37,3858.27 C220.2@4310.04,4015.75 v3(4330.71,4094.49) ; v3(4724.41,4094.49) C222.1@4784.45,4015.75 ; v3(4744.09,3826.77) C223.1@4805.12,3858.27
  other v1: 3370.08,1486.22
  other v2: 5366.14,3897.64 5421.26,3937.01 5366.14,3976.38
INT_N15: C222.2 C223.2 F201.1 U220.7 | length 4544.3
  Top Layer w15.75: U220.7@4773.23,4370.08 C222.2@4900.59,4015.75 4391.73,4421.26 4139.76,4421.26 4124.02,4417.32 4120.08,4366.14 4155.51,3964.57 4179.13,3830.71 4183.07,3814.96 4742.13,3795.28 4832.68,3814.96 C223.2@4879.92,3858.27
  Top Layer w19.68: v3(6574.8,4133.86) F201.1@6635.63,4055.12
  Bottom Layer w19.68: U220.7@4773.23,4370.08 4863.78,4314.96 v3(6574.8,4133.86)
INV_I: R700.2 R701.2 U700.2 | length 631.5
  Top Layer w5.91: U700.2@5375,1599.8 5422.32,1599.8 5450.63,1628.13 5465.55,1628.13
  Top Layer w7.87: R700.2@5071.85,1692.91 5465.55,1692.91 ; 5465.55,1628.13 5465.55,1692.91 ; R701.2@5504.92,1732.28 5479.25,1732.28 5479.25,1706.63 5465.55,1692.91
INV_PHI: R900.2 R901.2 U900.2 | length 631.5
  Top Layer w5.91: U900.2@5375,339.96 5422.32,339.96 5450.63,368.31 5465.55,368.31
  Top Layer w7.87: R900.2@5071.85,433.07 5465.55,433.07 ; 5465.55,368.31 5465.55,433.07 ; R901.2@5504.92,472.44 5479.25,472.44 5479.25,446.77 5465.55,433.07
INV_Q: R800.2 R801.2 U800.2 | length 631.5
  Top Layer w5.91: U800.2@5375,969.88 5422.32,969.88 5450.63,998.21 5465.55,998.21
  Top Layer w7.87: R800.2@5071.85,1062.99 5465.55,1062.99 ; 5465.55,998.21 5465.55,1062.99 ; R801.2@5504.92,1102.36 5479.25,1102.36 5479.25,1076.71 5465.55,1062.99
LDO_BYP: C216.1 U212.4 | length 181.6
  Top Layer w7.87: U212.4@5493.11,2917.13 5541.42,2917.13 5541.42,2861.37 5513.78,2833.74 C216.1@5513.78,2795.28
MCU_3V3: C302.1 C404.1 C602.1 C1005.1 R401.1 R402.1 R403.1 R600.1 R601.1 R1004.1 U300.36 U302.5 U400.16 U600.8 U600.9 U600.10 U600.16 U1001.5 | length 10100.2
  Top Layer w5.91: 2762.8,1113.17 2797.59,1078.38 ; R402.1@2762.8,1141.73 2771.65,1149.61 2854.33,1232.28 2854.33,1287.4 2850.39,1287.4 2846.46,1291.34 2807.09,1291.34 2783.46,1267.72 2779.53,1267.72 2775.59,1263.78 2771.65,1263.78 R401.1@2762.8,1259.84 ; v1(3055.12,1299.21) 3062.99,1307.09 3062.99,1385.83 3066.93,1389.76 3066.93,1393.7 3078.74,1405.51 3078.74,1429.13 3082.68,1433.07 3082.68,1437.01 3102.36,1456.69 3102.36,1507.87 3137.8,1543.31 3196.85,1543.31 3200.79,1547.24 3307.09,1547.24 U600.16@3316.93,1551.18 ; v1(3185.04,1318.9) 3188.98,1322.83 3216.54,1322.83 3224.41,1330.71 3437.01,1330.71 3444.88,1322.83 3496.06,1322.83 v1(3503.94,1314.96) ; U600.8@3375.98,1440.94 3401.57,1440.94 U600.9@3401.57,1466.54 ; U600.10@3401.57,1486.22 U600.9@3401.57,1466.54 ; v1(3429.13,1468.5) 3437.01,1468.5 3440.94,1464.57 3450.41,1459.29 3443.17,1466.54 ; v1(3448.82,1452.76) 3448.82,1456.69 3443.17,1466.54 ; v1(3480.31,1625.98) v1@3485.16,1633.86 ; 3790.34,3977.97 3798.8,3969.5 3908.12,3969.5 ; U1001.5@4572.36,2362.2 4607.36,2362.2 4607.36,2377.01 4608.27,2377.94 ; U600.9@3401.57,1466.54 3443.17,1466.54
  Top Layer w7.87: R403.1@2329.72,826.77 2329.72,871.14 2498.94,1040.35 U400.16@2543.31,1040.35 2623.94,1040.35 2678.07,986.22 C404.1@2716.54,986.22 2716.54,1015.82 2735.04,1015.82 2797.59,1078.38 ; C302.1@2600.39,3110.24 2630,3110.24 2643.85,3124.09 2643.85,3302.39 2646.58,3305.12 2682.58,3305.12 2718.58,3305.12 2796.14,3382.68 3341.09,3382.68 3541.09,3582.68 3801.61,3582.68 3918.19,3699.25 ; 2762.8,1113.17 R402.1@2762.8,1141.73 ; R401.1@2762.8,1259.84 2788.46,1259.84 2788.46,1269.47 3058.89,1539.9 3198.05,1539.9 C602.1@3267.72,1609.57 ; C602.1@3267.72,1616.14 C602.1@3267.72,1609.57 ; U600.16@3316.93,1551.18 3316.93,1572.91 3303.3,1586.54 3267.72,1586.54 C602.1@3267.72,1609.57 ; v1@3450.41,1459.29 3482.74,1426.96 4448.2,1426.96 v1(4449.76,1428.52) ; R600.1@3510.83,1633.86 3485.16,1633.86 3485.16,1657.81 3490.85,1663.51 3597,1663.51 3602.25,1658.25 3602.25,1562.12 R601.1@3661.42,1502.95 ; U300.36@3617.72,4132.68 3635.63,4132.68 3790.34,3977.97 ; 3908.12,3969.5 3918.19,3959.43 3918.19,3699.25 ; v1(4327.54,3699.25) 3918.19,3699.25 ; v1(4530.21,2202) v1@4536.34,2195.87 ; R1004.1@4534.45,2165.35 4534.45,2193.97 v1@4536.34,2195.87 ; U1001.5@4572.36,2362.2 4536.34,2362.2 v1@4536.34,2195.87 ; 4607.36,2377.01 4608.27,2377.94 ; C1005.1@4608.27,2480.31 4608.27,2441.85 ; 4608.27,2377.94 4608.35,2378 ; 4608.27,2377.94 4608.35,2378 ; 4608.27,2441.85 4608.35,2441.78 ; 4608.27,2441.85 4608.35,2441.78 ; 4608.35,2378 4610.31,2381.93 4611.3,2397.68 4608.35,2441.78
  Bottom Layer w5.91: v1(3055.12,1299.21) 3066.93,1311.02 3070.87,1311.02 3074.8,1314.96 3082.68,1314.96 3086.61,1318.9 v1(3185.04,1318.9) ; v1(3429.13,1468.5) 3429.13,1500 3433.07,1503.94 3433.07,1511.81 3437.01,1515.75 3437.01,1519.68 3440.94,1523.62 3440.94,1531.5 3444.88,1535.43 3444.88,1539.37 3448.82,1543.31 3448.82,1547.24 3452.76,1551.18 3452.76,1559.06 3456.69,1562.99 3456.69,1566.93 3460.63,1570.87 3460.63,1578.74 3464.57,1582.68 3464.57,1586.61 3468.5,1590.55 3468.5,1598.43 3472.44,1602.36 3472.44,1606.3 3476.38,1610.24 3476.38,1614.17 3480.31,1618.11 v1(3480.31,1625.98) ; v1(3448.82,1452.76) 3448.82,1448.82 3452.76,1444.88 3452.76,1440.94 3456.69,1437.01 3456.69,1433.07 3460.63,1429.13 3460.63,1421.26 3464.57,1417.32 3464.57,1413.39 3468.5,1409.45 3468.5,1401.57 3472.44,1397.64 3472.44,1393.7 3476.38,1389.76 3476.38,1381.89 3480.31,1377.95 3480.31,1374.02 3484.25,1370.08 3484.25,1366.14 3488.19,1362.2 3488.19,1354.33 3492.13,1350.39 3492.13,1346.46 3496.06,1342.52 3496.06,1334.65 3500,1330.71 3500,1326.77 3503.94,1322.83 v1(3503.94,1314.96)
  Bottom Layer w7.87: v1(4327.54,3699.25) 4449.76,3577.03 4449.76,2202 ; v1(4449.76,1428.52) 4449.76,2202 ; v1(4530.21,2202) 4449.76,2202
MCU_ARM: R302.1 U300.6 U1000.3 U1000.11 | length 2766.8
  Top Layer w5.91: U1000.3@4036.42,2673.43 4083.74,2673.43 4112.05,2645.09 4126.97,2645.09
  Top Layer w7.87: R302.1@2716.54,4022.64 2745.15,4022.64 2755.19,4032.68 U300.6@2917.72,4032.68 v1(3399.56,4032.68) ; v1(3979.57,2673.43) U1000.3@4036.42,2673.43 ; 4126.97,2645.09 4182.99,2589.06 4182.99,2523.43 U1000.11@4231.3,2523.43
  Bottom Layer w7.87: v1(3399.56,4032.68) 3452.06,3980.17 3636.48,3980.17 4003.39,3613.26 4003.39,2697.25 v1(3979.57,2673.43)
MCU_HEARTBEAT: U300.7 U1000.2 | length 1891.9
  Top Layer w7.87: U300.7@2917.72,3932.68 v1(3205.18,3932.68) ; v1(3980,2723.43) 3988.11,2723.43 U1000.2@4036.42,2723.43
  Bottom Layer w7.87: v1(3205.18,3932.68) 3205.18,3679.91 3602.41,3282.68 3632.78,3282.68 3980,2935.46 v1(3980,2723.43)
MCU_RUN: SW300.1 U300.30 | length 557.9
  Top Layer w7.87: U300.30@3617.72,3532.68 3806.22,3532.68 3840.48,3566.93 SW300.1@3877.95,3566.93 SW300.1@3877.95,3283.46
MCU_UART_RX: U300.2 U302.4 | length 1518.1
  Top Layer w7.87: U302.4@2682.58,3230.31 v1(2726.78,3230.31)
  Bottom Layer w5.91: 2782.22,3704.13 2872.43,3613.93 2872.43,3579.24 ; 2872.43,3794.33 2872.43,4051.43 2903.67,4082.68 ; 2931.77,4182.68 2956.33,4158.12 2963.01,4158.12
  Bottom Layer w7.87: v1(2726.78,3230.31) 2726.78,3433.6 2872.43,3579.24 ; 2782.22,3704.13 2872.43,3794.33 ; 2903.67,4082.68 2933.33,4082.68 2966.85,4116.2 2966.85,4154.28 2963.01,4158.12 ; U300.2@2917.72,4432.68 2871.63,4386.59 2871.63,4212.82 2901.77,4182.68 2931.77,4182.68
MCU_UART_TX: U300.1 U301.2 | length 1233.3
  Top Layer w5.91: v1(2548.17,3503.94) U301.2@2593.01,3503.94
  Bottom Layer w7.87: v1(2548.17,3503.94) 2548.17,4129.11 2906.38,4487.33 2917.72,4487.33 U300.1@2917.72,4532.68
MID_DIV: C604.1 R602.2 R603.1 U601.3 | length 705
  Top Layer w5.91: U601.3@3249.02,919.88 3296.33,919.88 3296.33,940.39 3304.16,948.21
  Top Layer w7.87: R602.2@3110.24,1410.43 3079.75,1379.95 3079.75,1218.48 3110.24,1187.99 3110.24,1162.33 3128.86,1143.7 C604.1@3228.35,1143.7 3228.35,1114.1 3304.16,1038.28 3304.16,948.21
MON_I: C1110.1 R1110.2 R1111.2 R1112.1 U400.7 U1101.4 U1101.7 | length 4038.5
  Top Layer w5.91: U400.7@2279.46,1189.88 2282.31,1187.02 2298.61,1187.02 ; 2304.34,1187.99 2782.29,1665.94 2782.29,1674.74 ; 2865.98,1738.92 3834.46,1738.92 3850.34,1754.8 ; U1101.7@4233.27,1464.17 4280.59,1464.17 4308.9,1492.5 4328.82,1492.5 ; 4383.35,1485.24 4645.67,1485.24 4627.97,1502.94 4580.91,1502.94 ; R1111.2@4645.67,1725.39 4645.67,1750.07 4717.44,1821.83 4796.26,1821.83 ; 4652.94,1492.5 4758.25,1492.5 C1110.1@4801.25,1535.5
  Top Layer w7.87: U400.7@2259.84,1193.9 2275.44,1193.9 U400.7@2279.46,1189.88 ; 2298.61,1187.02 2299.57,1187.99 2304.34,1187.99 ; 2782.29,1674.74 2846.47,1738.92 2865.98,1738.92 ; 3850.34,1754.8 v1(4010.03,1754.8) ; U1101.7@4233.27,1464.17 4184.96,1464.17 4175.74,1464.17 4155.86,1484.05 4155.86,1591.53 v1(4158.41,1594.08) 4178.5,1614.17 4184.96,1614.17 U1101.4@4233.27,1614.17 ; 4328.82,1492.5 4336.1,1485.24 4383.35,1485.24 ; 4580.91,1502.94 4580.91,1526.72 4465.19,1642.44 4383.32,1642.44 4378.81,1646.96 4378.81,1680.08 4387.9,1689.17 4635.11,1689.17 4645.67,1699.73 R1111.2@4645.67,1725.39 ; R1112.1@4645.67,1463.58 4645.67,1484.09 4645.67,1485.24 4652.94,1492.5 ; 4796.26,1821.83 R1110.2@4796.26,1850.39 ; C1110.1@4801.25,1535.5 C1110.1@4803.15,1537.4
  Bottom Layer w7.87: v1(4010.03,1754.8) 4010.03,1742.45 v1(4158.41,1594.08)
MON_PHI: C1112.1 R1118.2 R1119.2 R1120.1 U400.9 U1102.4 U1102.7 | length 4322.9
  Top Layer w5.91: 2986.4,773.61 3614.71,773.61 ; v1(4647.83,465.55) 4657.41,465.55 R1119.2@4685.04,465.55 ; 4680.12,616.38 4690.08,626.38 4714.65,626.38
  Top Layer w7.87: U400.9@2259.84,1142.72 2215.48,1142.72 2215.48,869.09 2301.83,782.74 2591.79,782.74 2677.04,867.99 2924.92,867.99 2986.4,806.51 2986.4,773.61 ; 3614.71,773.61 3742.44,901.34 4086.31,901.34 4151.02,836.63 4151.02,827.4 4191.02,787.4 4437.63,787.4 v1(4455.59,769.44) ; C1112.1@4566.93,238.19 4703.66,238.19 4705.63,236.22 4731.3,236.22 4756.97,236.22 4756.97,245.83 4779.8,268.7 ; U1102.7@4666.34,598.03 U1102.7@4680.12,598.03 ; U1102.4@4666.34,748.03 4714.65,748.03 4714.65,626.38 ; v1(4678.72,274.46) 4774.04,274.46 4779.8,268.7 ; 4680.12,616.38 U1102.7@4680.12,598.03 ; R1119.2@4685.04,465.55 4685.04,491.22 4714.65,520.83 4714.65,598.03 U1102.7@4680.12,598.03 ; R1118.2@4921.26,268.7 4779.8,268.7
  Bottom Layer w7.87: v1(4455.59,769.44) 4647.83,577.2 v1(4647.83,465.55) 4678.72,434.67 v1(4678.72,274.46)
MON_Q: C1111.1 R1114.2 R1115.2 R1116.1 U400.8 U1101.8 U1101.11 | length 3481.9
  Top Layer w5.91: U400.8@2259.84,1168.31 2303.22,1168.31 2310.1,1175.18 2328.51,1175.18
  Top Layer w7.87: 2328.51,1175.18 2328.51,1191.69 2859.08,1722.26 3863.36,1722.26 3949.72,1635.9 4344.69,1635.9 v1(4366.42,1614.17) U1101.11@4428.15,1614.17 ; v1(4350.51,1448.69) 4364.37,1448.69 4379.84,1464.17 U1101.8@4428.15,1464.17 ; v1(4516.97,1326.04) 4525,1317.99 4527.56,1317.99 4527.56,1305.16 ; R1115.2@4527.56,1292.32 4527.56,1305.16 ; R1116.1@4652.56,1181.1 R1116.1@4665.39,1181.1 ; R1114.2@4717.52,1338.58 4691.85,1338.58 4691.85,1326.94 4670.08,1305.16 4665.39,1305.16 ; C1111.1@4805.12,1181.1 4775.51,1181.1 4746.69,1152.29 4697.4,1152.29 4678.23,1171.48 4678.23,1181.1 R1116.1@4665.39,1181.1 ; 4527.56,1305.16 4665.39,1305.16 ; R1116.1@4665.39,1181.1 4665.39,1305.16
  Bottom Layer w7.87: v1(4366.42,1614.17) 4350.51,1598.26 v1(4350.51,1448.69) 4394.29,1448.69 v1(4516.97,1326.04)
N15_FUSED: D202.1 F201.2 | length 515
  Top Layer w19.68: D202.1@6732.28,3740.16 6783.54,3740.16 6800.67,3723.02 v1(6825.63,3723.02) ; F201.2@6828.94,4055.12 v1(6886.3,4055.12)
  Bottom Layer w19.68: v1(6825.63,3723.02) 6825.63,3994.44 v1(6886.3,4055.12)
NONINV_I: R702.2 R703.1 U700.3 | length 635.2
  Top Layer w5.91: 5317.01,1578.13 5327.68,1567.45 5327.68,1549.8 U700.3@5375,1549.8
  Top Layer w7.87: R702.2@5071.85,1496.06 5097.52,1496.06 5113.35,1496.06 ; R703.1@5236.22,1384.84 5207.6,1384.84 5207.6,1401.8 5113.35,1496.06 ; 5317.01,1578.13 5317.01,1635.76 5310.47,1642.27 5242.09,1642.27 5113.35,1513.51 5113.35,1496.06
NONINV_PHI: R902.2 R903.1 U900.3 | length 559.1
  Top Layer w5.91: U900.3@5375,289.96 5422.32,289.96 5422.32,269.45 5430.16,261.61
  Top Layer w7.87: R902.2@5071.85,236.22 5097.52,236.22 5207.6,126.14 5207.6,125 5236.22,125 5325.2,125 5430.16,229.92 5430.16,261.61
NONINV_Q: R802.2 R803.1 U800.3 | length 813.8
  Top Layer w7.87: v1(4965.28,842.02) 4971.65,835.63 5025.31,835.63 5046.18,856.52 5046.18,866.14 R802.2@5071.85,866.14 ; v1(5078.03,729.25) 5236.22,729.25 5236.22,754.92 5325.39,754.92 5423.31,852.84 5423.31,919.88 U800.3@5375,919.88
  Bottom Layer w7.87: v1(4965.28,842.02) v1(5078.03,729.25)
P15_FUSED: F200.2 Q200.3 | length 410.5
  Top Layer w31.5: Q200.3@6023.62,4015.75 6023.62,4053.22 v1(6062.32,4053.22) ; v1(6328.58,4055.12) F200.2@6395.87,4055.12
  Bottom Layer w31.5: v1(6062.32,4053.22) 6326.69,4053.22 v1(6328.58,4055.12)
PD_K: C500.1 R500.1 R506.2 U500.2 | length 493.5
  Top Layer w7.87: R506.2@443.5,1289.37 452.76,1301.18 452.76,1324.21 ; U500.2@532.48,1324.21 452.76,1324.21 ; C500.1@592.52,1555.12 597.44,1456.69 452.76,1456.69 452.76,1324.21
PD_RAW: J500.1 R506.1 | length 28.7
  Top Layer w7.87: J500.1@356.3,1299.21 R506.1@383.27,1289.37
PHOTO_ADC: C507.1 R505.2 TP501.1 U400.6 | length 490.9
  Top Layer w7.87: R505.2@1922.24,1023.62 1947.91,1023.62 1989.25,1064.96 C507.1@2047.24,1064.96 2085.7,1064.96 ; TP501.1@2125.98,1023.62 2085.7,1064.96 ; U400.6@2259.84,1219.49 2215.48,1219.49 2215.48,1194.73 2085.7,1064.96
PICO_VSYS: C300.1 D300.1 U300.39 | length 665.8
  Top Layer w19.68: C300.1@3858.27,4233.27 3858.27,4271.73 3879.3,4271.73 3927.84,4320.26 3927.84,4424.19 ; D300.1@3976.38,4488.19 3976.38,4436.93 3940.59,4436.93 3927.84,4424.19 ; U300.39@3626.21,4424.19 U300.39@3617.72,4432.68 U300.39@3626.21,4424.19 ; U300.39@3626.21,4424.19 3646.88,4414.34 3838.81,4412.37 3927.84,4424.19
RAIL_NEG: R1008.2 R1009.2 U1102.10 | length 2230.1
  Top Layer w7.87: U1102.10@4861.22,698.03 v1(4918.07,698.03) ; v1(4972.2,2512.8) 5118.11,2512.8 5118.11,2538.46 5089.37,2567.2 5089.37,2625.5 5108.5,2644.61 5118.11,2644.61 R1008.2@5118.11,2670.28
  Bottom Layer w7.87: v1(4918.07,698.03) 4914.13,701.93 4914.13,2454.74 v1(4972.2,2512.8)
RAIL_POS: R1006.2 R1007.1 U1102.9 | length 2428.1
  Top Layer w7.87: U1102.9@4861.22,648.03 v1(4917.6,648.03) ; v1(4881.89,2688.26) 4881.89,2723.43 4881.89,2749.09 4891.5,2749.09 4911.89,2769.47 4911.89,2806.89 4884.65,2834.15 4876.81,2834.15 4852.87,2858.08 4852.87,2916.85 R1006.2@4881.89,2945.87
  Bottom Layer w7.87: v1(4881.89,2688.26) 4881.89,683.74 v1(4917.6,648.03)
REF_ADC: C400.1 C401.1 R400.2 R501.1 U400.4 U1100.3 | length 5439.6
  Top Layer w5.91: 1965.51,1110.22 2032.65,1110.22 2035.5,1107.36 ; 2203.81,1263.8 2209.59,1263.8 2216.46,1270.67 U400.4@2259.84,1270.67 ; 3992.76,886.25 3988.19,877.95 3988.19,842.52 3992.13,838.58 4078.74,838.58 4086.61,830.71 4086.61,795.28 4078.74,787.4 4066.93,787.4 4043.31,763.78 U1100.3@4036.42,762.4
  Top Layer w7.87: R501.1@275.59,715.55 275.59,665.98 488.96,452.6 1911.74,452.6 2014.69,555.55 2014.69,574.8 R400.2@2040.35,574.8 ; 1965.51,1110.22 1956.9,1110.22 1896.23,1049.55 1896.23,951.49 2107.48,740.24 2125.98,740.24 C400.1@2125.98,710.63 2125.98,681.02 2048.38,603.43 2040.35,603.43 R400.2@2040.35,574.8 ; 2035.5,1107.36 2080.29,1107.36 2165.35,1192.43 C401.1@2165.35,1230.31 2203.81,1230.31 2203.81,1263.8 ; 3992.76,886.25 3649.69,543.19 2097.64,543.19 2066.02,574.8 R400.2@2040.35,574.8
REF_ADC_RAW: R400.1 U401.6 | length 128.8
  Top Layer w5.91: U401.6@1869.09,526.18 1916.41,526.18 1944.74,554.53 1959.14,554.53
  Top Layer w7.87: 1959.14,554.53 1959.14,558.54 R400.1@1975.39,574.8
REF_BUF: R1009.1 R1100.1 R1103.1 R1111.1 R1115.1 R1119.1 U1100.2 U1100.6 | length 4951.2
  Top Layer w5.91: 3968.5,812.4 3972.44,803.15 3972.44,799.21 3976.38,795.28 3976.38,791.34 3980.31,787.4 3980.31,779.53 3984.25,775.59 3984.25,771.65 3988.19,767.72 3988.19,692.91 4019.68,661.42 4019.68,598.43 R1103.1@4022.64,590.55 ; U1100.2@4036.42,812.4 4027.56,807.09 4019.68,807.09 4015.75,803.15 4011.81,803.15 4007.87,799.21 4003.94,799.21 3988.19,783.46 3988.19,740.16 4082.68,740.16 4086.61,744.09 4086.61,771.65 4098.43,783.46 4098.43,787.4 4102.36,791.34 4102.36,834.65 4098.43,838.58 4098.43,842.52 4094.49,846.46 v1(4094.49,854.33) ; R1100.1@4062.01,1062.99 4066.93,1055.12 v1(4066.93,925.2) ; 4068.9,508.03 4140.67,436.26 4140.67,371.77 ; 4358.46,1189.12 4360.59,1189.12 4405.2,1233.72
  Top Layer w7.87: R1103.1@4022.64,590.55 4022.64,554.29 4068.9,508.03 ; U1100.2@4036.42,812.4 3968.5,812.4 3968.5,629.92 4299.21,629.92 4299.21,762.4 U1100.6@4231.3,762.4 ; R1100.1@4062.01,1062.99 4087.68,1062.99 4087.68,1074.5 4194.29,1181.1 4350.47,1181.1 4358.46,1189.12 ; 4140.67,371.77 4243.19,269.25 4605.47,269.25 4685.04,348.82 R1119.1@4685.04,400.59 ; R1115.1@4527.56,1227.36 4411.57,1227.36 4405.2,1233.72 4405.2,1245.02 4595.55,1435.37 4763.62,1435.37 4843.46,1515.19 4843.46,1660.43 ; R1111.1@4645.67,1660.43 4843.46,1660.43 ; v1(4935.87,1660.43) 4843.46,1660.43 ; v1(5053.46,2447.83) R1009.1@5118.11,2447.83
  Bottom Layer w5.91: v1(4066.93,925.2) 4066.93,881.89 v1(4094.49,854.33)
  Bottom Layer w7.87: v1(4935.87,1660.43) 5053.46,1778.02 v1(5053.46,2447.83)
REF_DAC: C603.1 R602.1 U600.1 | length 352.5
  Top Layer w5.91: 3194.96,1520.49 3212.93,1520.49 3220.78,1528.34 3267.84,1528.34 3270.59,1525.59 U600.1@3291.34,1525.59
  Top Layer w7.87: R602.1@3110.24,1345.47 3110.24,1371.14 3119.86,1371.14 3172.28,1423.56 C603.1@3172.28,1477.36 ; C603.1@3149.61,1477.36 C603.1@3172.28,1477.36 ; 3194.96,1520.49 3194.96,1477.36 C603.1@3172.28,1477.36
RELAY_EN: R1002.1 U1001.4 | length 174.5
  Top Layer w5.91: U1001.4@4572.36,2324.8 4607.36,2324.8 4623.07,2340.54 4709.65,2340.54
  Top Layer w7.87: 4709.65,2340.54 R1002.1@4731.3,2362.2
RELAY_GATE: Q1000.1 R1002.2 R1003.1 | length 322.7
  Top Layer w7.87: R1002.2@4796.26,2362.2 4891.65,2362.2 4893.62,2360.24 ; R1003.1@4888.78,2165.35 4888.78,2355.39 4893.62,2360.24 ; Q1000.1@4921.26,2360.24 4893.62,2360.24
SAFE_R_I: K700.2 R705.1 | length 250
  Top Layer w7.87: R705.1@6023.62,1438.48 6023.62,1470.55 6034.61,1470.55 6116.06,1552.01 6116.06,1598.43 K700.2@6161.42,1598.43
SAFE_R_PHI: K900.2 R905.1 | length 525.9
  Top Layer w7.87: R905.1@6023.62,178.66 6023.62,146.57 6031.42,138.78 6200.94,138.78 6207.32,145.16 6207.32,185.91 6180.67,212.56 6133.39,212.56 6116.06,229.88 6116.06,338.58 K900.2@6161.42,338.58
SAFE_R_Q: K800.2 R805.1 | length 243.6
  Top Layer w7.87: R805.1@6023.62,808.56 6023.62,840.63 6023.62,843.98 6116.06,936.42 6116.06,968.5 K800.2@6161.42,968.5
SK_A: C504.1 R503.2 R504.1 | length 382.6
  Top Layer w7.87: R503.2@1095.47,1279.53 1108.31,1279.53 ; C504.1@1162.4,1377.95 1129.85,1377.95 1129.85,1288.24 1121.14,1279.53 1108.31,1279.53 ; R504.1@1220.47,1109.25 1220.47,1134.92 1210.85,1134.92 1108.31,1237.46 1108.31,1279.53